# Altium PCB Pukk-Display-Module-v1.0.PcbDoc (part 5 of 5)
Units mil, origin at the board's own origin, x right, y up, seen from the top; angles counter-clockwise.
Board outline 3740.16 x 1574.8 mil, 4 copper layers (Top Layer, GND, POWER, Bottom Layer), stack 61.653 mil thick; 157 components, 115 nets, 640 pads, 314 vias.
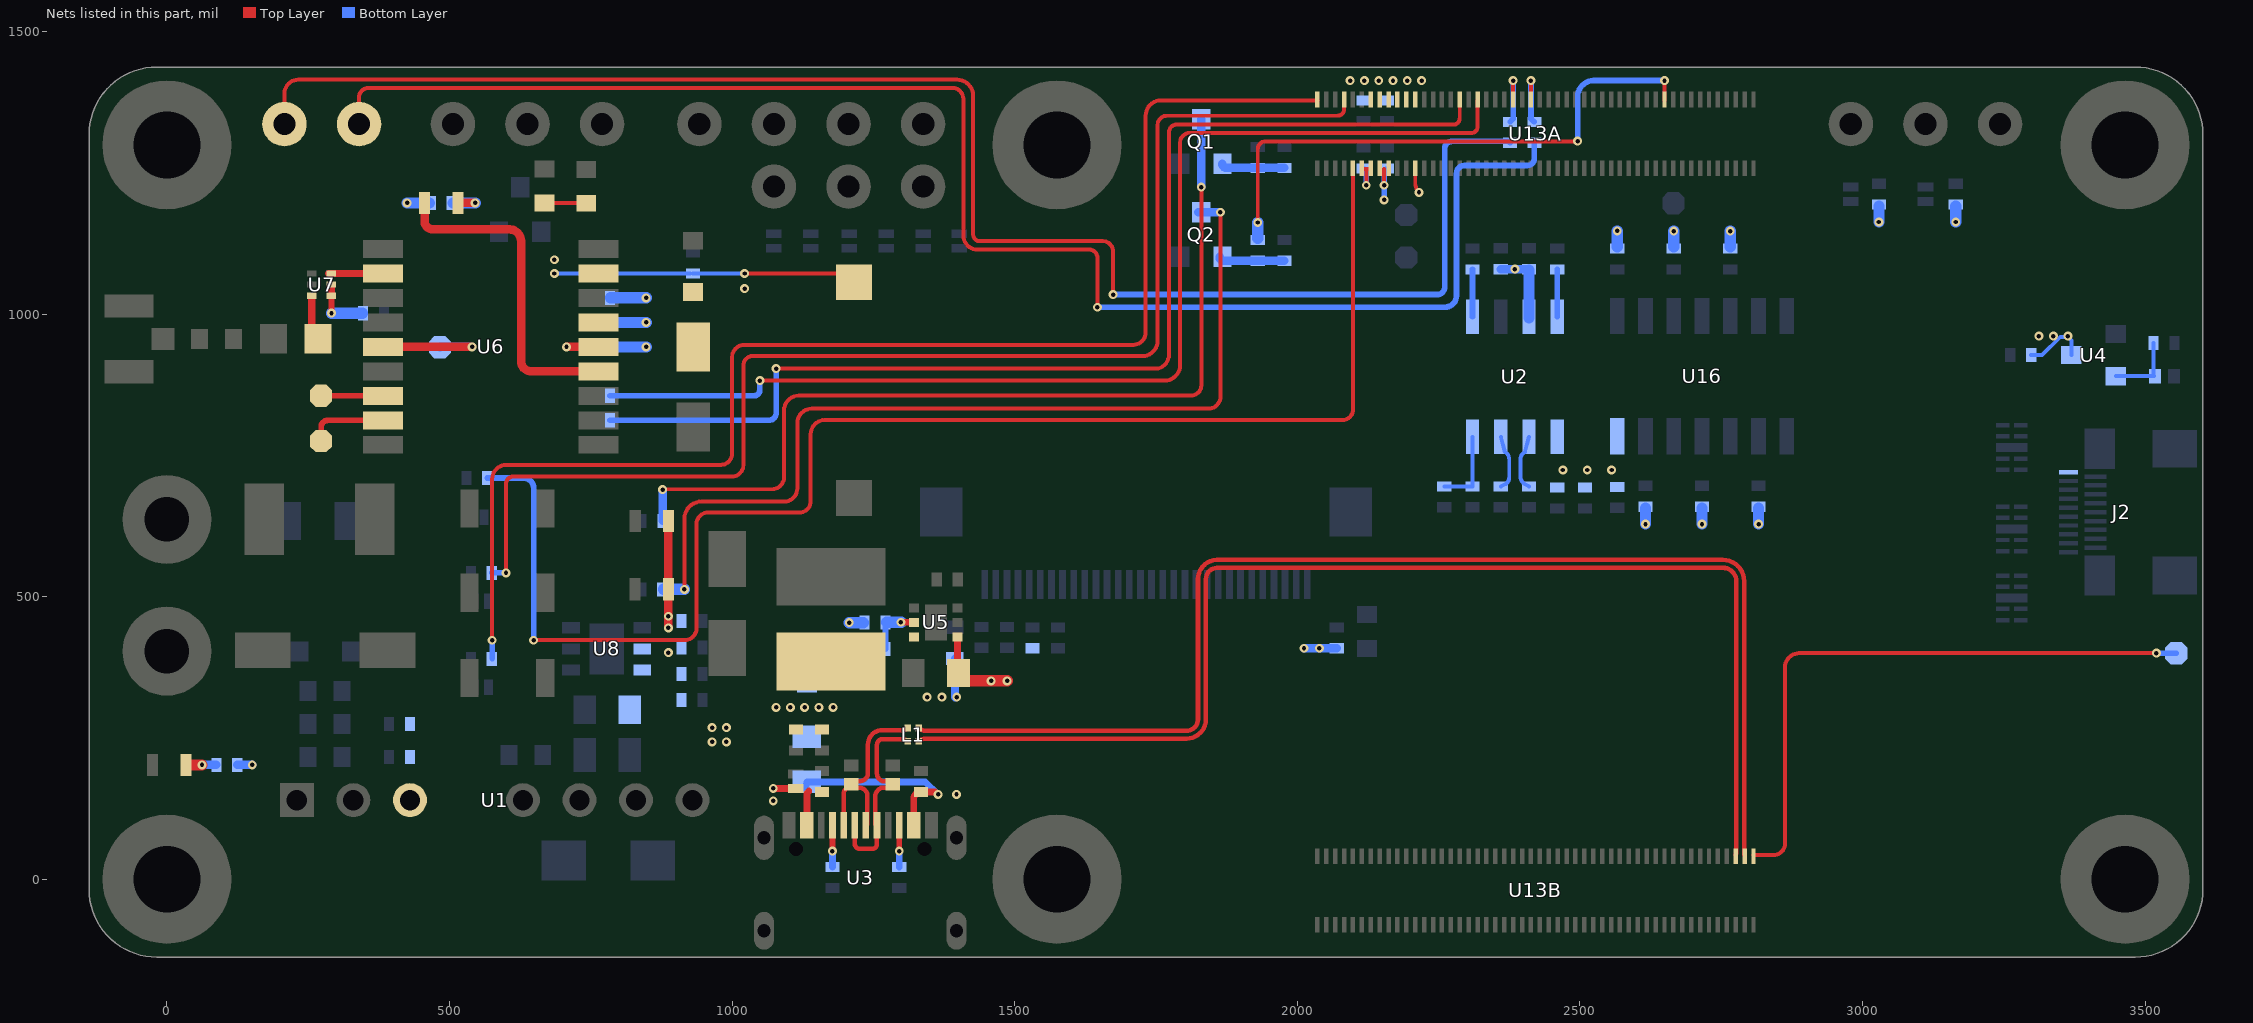
[diagram p5: the nets of this part, all layers, seen from the top]

## Via types
v1: diameter 15.75, hole 7.87, Top Layer to Bottom Layer, tented both sides, 314 vias

## Nets (pads, with @x,y where several pads share a name; then routed paths per layer and width w, separated by ;. In a path a pad name is that pad's centre, name@x,y a point inside that pad or via, vN(x,y) a via of type N, cw(c..) or ccw(c..) an arc to the next point about the centre after c; other vN are vias at no path point) (continued)
NetJ4_1: J4.1 R21.1 U6.6 | length 525.1
  Top Layer w7: v1(1022.01,1071.69) J4.1@1213.87,1071.69 ; J4.1@1213.87,1058.15 J4.1@1215.72,1056.3
  Bottom Layer w7: v1(685.5,1071.69) R21.1@925.16,1071.69 ; R21.1@931.01,1071.69 v1(1022.01,1071.69)
  other v1: 1022.01,1045 685.5,1096
NetL3_1: L3.1 U7.3 | length 80.9
  Top Layer w13.1: U7.3@256.54,1030.68 256.54,966.81 ccw(c267.37,966.81) L3.1@267.37,955.99
NetLED1_1: LED1.1 R1.2 | length 51
  Top Layer w20: LED1.1@35.76,202 v1@61.71,202
  Bottom Layer w15: v1(62.09,202.38) R1.2@87.12,202.38
NetLED2_1: LED2.1 R22.2 | length 72
  Top Layer w15: LED2.1@514.89,1196.46 v1(545.37,1196.51)
  Bottom Layer w7: R22.2@503.87,1196.46 R22.2@506.37,1196.46
  Bottom Layer w20: R22.2@506.37,1196.46 506.42,1196.51 v1(545.37,1196.51)
NetLED2_2: LED2.2 U6.4 | length 583.3
  Top Layer w15: LED2.2@455.84,1196.46 455.84,1164.29 ccw(c470.38,1164.29) 470.38,1149.75 606.15,1149.75 cw(c606.15,1129.3) 626.59,1129.3 626.59,916.43 ccw(c644.56,916.43) 644.56,898.47 U6.4@763.89,898.47
NetP6_1: P6.1 U6.17 | length 140.3
  Top Layer w10: P6.1@273.03,775.59 273.03,800.36 cw(c284.52,800.36) 284.52,811.85 U6.17@382,811.85
NetP7_1: P7.1 U6.16 | length 109.4
  Top Layer w10: P7.1@272.64,855.21 U6.16@382,855.16
NetP8_1: P8.1 U6.14 | length 215.4
  Top Layer w15: U6.14@382,941.77 v1(540,941.77)
  Bottom Layer w15: P8.1@483,941 cw(c483.77,941) 483.77,941.77 v1(540,941.77)
NetQ1_1: Q1.1 R33.2 R35.2 | length 113.6
  Bottom Layer w15: Q1.1@1867.5,1265.63 ccw(c1874.61,1265.63) 1874.61,1258.52 R33.2@1930,1258.52 R35.2@1977,1258.52
NetQ1_3: Q1.3 R30.2 | length 1634.8
  Top Layer w7: v1(877.06,689.36) 877.7,690 1070.66,690 ccw(c1070.66,711.11) 1091.77,711.11 1091.77,828.88 cw(c1118.66,828.88) 1118.66,855.77 1812.04,855.77 ccw(c1812.04,873.83) 1830.1,873.83 v1(1830.1,1224.56)
  Bottom Layer w7: R30.2@876.68,634 R30.2@876.87,634.19 ; v1@876.87,689.17 v1(877.06,689.36)
  Bottom Layer w15: R30.2@876.87,634.19 v1@876.87,689.17 ; v1(1830.1,1224.56) Q1.3@1830.1,1344.37
NetQ2_1: Q2.1 R34.2 R36.2 | length 118.7
  Bottom Layer w15: Q2.1@1862.4,1101.26 ccw(c1869.51,1101.26) 1869.51,1094.15 R34.2@1930,1094.15 R36.2@1977,1094.15
NetQ2_3: Q2.3 R31.2 | length 1648.2
  Top Layer w7: v1(915.64,512.86) 915.64,637.73 cw(c946.17,637.73) 946.17,668.26 1092.29,668.26 ccw(c1092.29,691.4) 1115.43,691.4 1115.43,806.78 cw(c1141.33,806.78) 1141.33,832.68 1842.88,832.68 ccw(c1842.88,853.8) 1864,853.8 v1(1864,1180)
  Bottom Layer w15: Q2.3@1825,1180 Q2.3@1830.1,1180 v1(1864,1180)
  Bottom Layer w20: R31.2@878.73,512.86 v1(915.64,512.86)
NetR3_1: R3.1 R4.2 U1.3
NetR5_2: R5.2 R6.2 U2.8 | length 137.7
  Bottom Layer w7: R5.2@2260,695 R6.2@2310,695 U2.8@2310,782.7
NetR7_1: R7.1 U2.7 | length 98.9
  Bottom Layer w7: R7.1@2360,695 2369,699.47 ccw(c2360,711.47) 2375,711.47 2375,734.74 2375,742.73 ccw(c2360,742.73) 2367.56,755.69 U2.7@2360,782.7
NetR8_2: R8.2 U2.1 | length 83.7
  Bottom Layer w10: U2.1@2310,995.3 R8.2@2310,1079
NetR9_1: R9.1 U2.6 | length 98.6
  Bottom Layer w7: R9.1@2410,695 2401,699.99 cw(c2410,711.99) 2395,711.99 2395,742.7 cw(c2410,742.7) 2402.5,755.69 U2.6@2410,782.7
NetR10_2: R10.2 U2.4 | length 83.7
  Bottom Layer w10: U2.4@2460,995.3 R10.2@2460,1079
NetR11_1: R11.1 SB1.2 | length 74.5
  Top Layer w7: SB1.2@668,1196.51 742,1196.51 R11.1@742,1196
NetR15_1: R15.1 R16.2 U5.5 | length 96
  Top Layer w12: v1(1298.69,454.6) U5.5@1321.82,454.6
  Bottom Layer w10: R16.2@1271.46,407.22 R15.1@1271.46,454.23 R15.1@1271.46,454.6
  Bottom Layer w20: R15.1@1273.46,454.6 v1(1298.69,454.6) v1@1299,454.6
NetR17_1: R17.1 R18.2 U5.1 | length 216.3
  Top Layer w12: U5.1@1398.97,428.64 1398.97,366.61 R18.2@1400.58,365 ccw(c1414.56,365) R18.2@1414.56,351.02
  Top Layer w20: R18.2@1414.56,351.02 v1(1458.38,351.02) v1(1486.59,351.02)
  Bottom Layer w15: v1(2011.81,408.59) v1(2039,408.59) R17.1@2069.82,408.59
NetR23_2: R23.2 U6.5 | length 96.9
  Top Layer w15: v1(707,941.74) U6.5@763.89,941.74
  Bottom Layer w10: v1(707,941.74) R23.2@747,941.74
PWRON_KEY: R32.1 U13A.99 | length 2398.6
  Top Layer w7: v1(575.42,422.88) 575.42,707.83 cw(c600.72,707.83) 600.72,733.12 980,733.12 ccw(c980,753.12) 1000,753.12 1000,923.56 cw(c1022.01,923.56) 1022.01,945.58 1710.12,945.58 ccw(c1710.12,967.17) 1731.71,967.17 1731.71,1350.92 cw(c1758.75,1350.92) 1758.75,1377.95 U13A.99@2035.43,1377.95
  Bottom Layer w7: R32.1@574.87,389.86 R32.1@575.42,390.41
  Bottom Layer w10: R32.1@575.42,390.41 v1(575.42,422.88)
RECOVERY_KEY: R29.2 U13A.93 | length 2299.1
  Top Layer w7: v1(600,542) 600,699.99 cw(c612.41,699.99) 612.41,712.4 999.28,712.4 ccw(c999.28,733.12) 1020,733.12 1020,909.19 cw(c1036.39,909.19) 1036.39,925.58 1725.96,925.58 ccw(c1725.96,952.47) 1752.86,952.47 1752.86,1334.5 cw(c1769.13,1334.5) 1769.13,1350.77 2071.38,1350.77 ccw(c2071.38,1362.07) 2082.67,1362.07 U13A.93@2082.67,1377.95
  Bottom Layer w10: R29.2@574.87,542 v1(600,542)
RESETn_KEY: R26.2 U13A.92 | length 2601.6
  Top Layer w7: v1@646.88,422.88 915.9,422.88 ccw(c915.9,444) 937.02,444 937.02,628.11 cw(c957.81,628.11) 957.81,648.9 1119.14,648.9 ccw(c1119.14,668.84) 1139.08,668.84 1139.08,787.56 cw(c1163.91,787.56) 1163.91,812.39 2080,812.39 ccw(c2080,830.81) 2098.42,830.81 U13A.92@2098.42,1256.69
  Bottom Layer w10: R26.2@566.87,709.86 631.05,709.86 cw(c631.05,692.02) 648.88,692.02 v1(648.88,422.88)
RF_OUT: U6.11 U7.6 | length 95.7
  Top Layer w13.1: U7.6@286.34,1071.69 U7.6@290.99,1071.69 U6.11@382,1071.69
TYPEC_CC1: R13.2 U3.A5 | length 74
  Top Layer w10: v1(1177.54,49.69) U3.A5@1177.56,95.73
  Bottom Layer w12: R13.2@1177.56,21.73 v1(1177.54,49.69)
TYPEC_CC2: R14.2 U3.B5 | length 74
  Top Layer w10: v1(1295.65,49.69) U3.B5@1295.67,95.73
  Bottom Layer w12: R14.2@1295.67,21.73 v1(1295.65,49.69)
UART2_RX_M0: R28.1 U13A.55 | length 110.5
  Top Layer w7: U13A.55@2381.89,1377.95 v1(2381.89,1413.09)
  Bottom Layer w10: R28.1@2376.46,1340 2381.89,1345.43 v1(2381.89,1413.09)
UART2_RXD: P20.1 R28.2 | length 2852.6
  Top Layer w7: P20.1@208,1336 208,1390 cw(c232.56,1390) 232.56,1414.56 1398.08,1414.56 cw(c1398.08,1386.12) 1426.53,1386.12 1426.53,1140.6 ccw(c1438.13,1140.6) 1438.13,1129 1655.47,1129 cw(c1655.47,1110.23) 1674.24,1110.23 1674.24,1034.42 v1(1674.06,1034.42)
  Bottom Layer w10: v1(1674.06,1034.42) 2247.68,1034.42 ccw(c2247.68,1047.51) 2260.78,1047.51 2260.78,1292.35 cw(c2273.92,1292.35) 2273.92,1305.5 2373.96,1305.5 R28.2@2376.46,1303
UART2_TX_M0: R27.1 U13A.51 | length 111.1
  Top Layer w7: U13A.51@2413.38,1377.95 v1(2413.38,1413.09)
  Bottom Layer w10: v1(2413.38,1413.09) 2413.38,1345.5 2418.88,1340 R27.1@2419.46,1340
UART2_TXD: P21.1 R27.2 | length 2769.3
  Top Layer w7: P21.1@340,1336 340,1383.28 cw(c356.56,1383.28) 356.56,1399.84 1390.18,1399.84 cw(c1390.18,1381.02) 1409,1381.02 1409,1139.39 ccw(c1434.4,1139.39) 1434.4,1114 1631.43,1114 cw(c1631.43,1099.06) 1646.37,1099.06 v1(1646.37,1012)
  Bottom Layer w10: v1(1646.37,1012) 2261.16,1012 ccw(c2261.16,1032.51) 2281.67,1032.51 2281.67,1248.41 cw(c2296.03,1248.41) 2296.03,1262.77 2406.85,1262.77 ccw(c2406.85,1275.38) 2419.46,1275.38 R27.2@2419.46,1303
UART6_RX_M1: R25.1 U13A.67 | length 2042.7
  Top Layer w7: v1(1078,903.41) 1751.96,903.41 ; 1752,903.41 ccw(c1751.96,910.41) 1753.61,903.61 ccw(c1747.49,928.37) 1773,928.37 1773,1321.61 cw(c1786.52,1321.61) 1786.52,1335.13 2276.1,1335.13 ccw(c2276.1,1346.42) 2287.4,1346.42 U13A.67@2287.4,1377.95
  Bottom Layer w10: R25.1@784,812 1065,812 ccw(c1065,825) 1078,825 v1(1078,903.41)
UART6_TX_M1: R24.1 U13A.63 | length 2029.4
  Top Layer w7: v1(1049,882.04) 1765.04,882.04 ccw(c1765.04,909.7) 1792.7,909.7 1792.7,1303.61 cw(c1809.22,1303.61) 1809.22,1320.13 2307.52,1320.13 ccw(c2307.52,1331.51) 2318.89,1331.51 U13A.63@2318.89,1377.95
  Bottom Layer w10: R24.1@784,855.31 1038.93,855.31 ccw(c1038.93,865.38) 1049,865.38 v1(1049,882.04)
USB_D_N: D7.1 L1.3 U3.A7 U3.B7 | length 344.6
  Top Layer w8: U3.B7@1197.24,95.73 1197.24,149.95 cw(c1211.08,149.95) D7.1@1211.08,163.79 ; D7.1@1211.02,167.94 1216.43,173.34 1225.73,173.34 ccw(c1225.73,187.91) 1240.3,187.91 1240.3,238.11 cw(c1266.01,238.11) 1266.01,263.83 1301.54,263.83 ccw(c1301.54,276.84) L1.3@1310.74,267.64 ; D7.1@1213.04,166.46 1219.52,161.72 1225.37,161.72 cw(c1225.37,147.64) 1239.46,147.64 1239.46,98.57 cw(c1236.61,98.57) U3.A7@1236.61,95.73 ccw(c1236.61,97.57) U3.A7@1238.46,97.57
USB_D_P: D6.1 L1.4 U3.A6 U3.B6 | length 360
  Top Layer w8: U3.A6@1216.93,95.73 1216.93,63.18 ccw(c1226.5,63.18) 1226.5,53.6 1247.65,53.6 ccw(c1247.65,62.25) 1256.3,62.25 U3.B6@1256.3,95.73 cw(c1256.3,98.57) 1253.46,98.57 1253.46,146.68 cw(c1268.97,146.68) 1268.97,162.19 1278.2,162.19 D6.1@1283.96,167.94 1278.96,172.94 1270.27,172.94 cw(c1270.27,186.9) 1256.3,186.9 1256.3,238.11 cw(c1266.01,238.11) 1266.01,247.83 1301.54,247.83 cw(c1301.54,234.82) L1.4@1310.74,244.02
USB_OTG0_D_N: L1.1 U13B.3 | length 2246.7
  Top Layer w8: L1.1@1330.43,267.64 ccw(c1342.04,279.25) 1342.04,262.83 1804.24,262.83 ccw(c1804.24,282.86) 1824.28,282.86 1824.28,531.09 cw(c1858.24,530.98) 1857.2,564.92 cw(c1857.83,542.93) 1857.77,564.93 2753.02,564.93 cw(c2753.02,527.49) 2790.46,527.49 2790.46,46.15 ccw(c2798.46,46.15) 2791.3,42.59 U13B.3@2791.34,42.51
USB_OTG0_D_P: L1.2 U13B.5 | length 2224.8
  Top Layer w8: L1.2@1330.43,244.02 cw(c1342.04,232.4) 1342.04,248.83 1804.24,248.83 ccw(c1804.24,282.86) 1838.28,282.86 1838.28,531.04 cw(c1858.24,530.98) 1857.61,550.93 cw(c1857.83,542.93) 1857.79,550.93 2753.02,550.93 cw(c2753.02,527.49) 2776.46,527.49 2776.46,46.15 cw(c2768.46,46.15) 2775.63,42.59 U13B.5@2775.59,42.51
USB_OTG0_ID: P19.1 U13B.1 | length 1085.7
  Top Layer w7: U13B.1@2807.08,42.51 2842.13,42.51 ccw(c2842.13,63.28) 2862.9,63.28 2862.9,374.92 cw(c2887.98,374.92) 2887.98,400 v1(3520,400)
  Bottom Layer w10: v1(3520,400) P19.1@3555,400
VCC1V8: C10.2 U13A.88 U13A.90 | length 73.2
  Top Layer w7: U13A.90@2114.17,1256.69 2122.04,1256.69 ; v1@2122.04,1229.79 2122.04,1256.69 ; U13A.88@2129.92,1256.69 2122.04,1256.69
  Bottom Layer w7: C10.2@2117.17,1257.56 cw(c2117.17,1252.69) C10.2@2122.04,1252.69
  Bottom Layer w10: v1@2122.04,1229.79 C10.2@2122.04,1252.69
  other v1: 2122.04,1227.79
VCC3V3: C9.2 C13.2 C14.2 C80.1 R37.2 R38.2 R39.2 R121.2 R122.2 R123.2 R124.2 R125.2 U2.5 U13A.78 U13A.84 U13A.86 U16.14 | length 352.1
  Top Layer w7: v1@2153.54,1229.79 2153.54,1256.69 ; U13A.78@2208.66,1256.69 2208.66,1231.3 ccw(c2231.36,1231.3) v1(2215.31,1215.26)
  Bottom Layer w7: C9.2@2153.54,1252.28 cw(c2158.83,1252.28) C9.2@2158.83,1257.56
  Bottom Layer w10: v1(2153.54,1202) v1(2153.54,1227.79) C9.2@2153.54,1252.28
  Bottom Layer w20: R121.2@2566,1118.81 v1@2566,1146.74 ; v1(2616,628.39) R37.2@2616,656.32 ; R122.2@2666,1118.81 v1(2666,1146.74) ; v1(2716,628.39) R125.2@2716,656.32 ; R123.2@2766,1118.81 v1(2766,1146.74) ; v1(2816,628.39) R124.2@2816,656.32 ; v1(3029,1162.79) R38.2@3029,1190.72 ; v1(3165,1162.79) R39.2@3165,1190.72
  other v1: 2470,724 2513,724 2556,724 2566,1147.09
VCC3V3_SYS: C27.2 C28.1 C29.2 C30.2 C34.2 C35.2 D13.2 FB1.1 LED3.1 LED4.1 R15.2 R19.2 R22.1 R23.1 U6.8 U7.4 U7.5 U8.2 | length 615
  Top Layer w10: v1@291.11,1001.53 U7.4@291.11,1032.32
  Top Layer w12: U7.4@291.01,1032.34 U7.5@291.01,1051.02
  Top Layer w15: v1(887.3,444.68) v1(887.3,465.19) LED3.1@887.3,512.86 LED4.1@887.3,634
  Bottom Layer w15: v1@1394.37,322.07 FB1.1@1394.37,390.47
  Bottom Layer w20: v1(291.18,1001.46) C27.2@346,1001.46 ; v1(425,1196.46) R22.1@464.36,1196.46 ; R23.1@785,941.74 v1(848,941.74) ; C29.2@785,985.14 v1(848,985.14) ; C30.2@785,1028.54 v1(848,1028.54) ; v1(1207.22,453.86) R15.2@1231.86,453.86
  other v1: 1344.96,322.07 1371.17,322.07 1397.37,322.07 887.3,401.08
VCC5V0_SYS: C7.2 C8.2 C11.2 C12.2 C15.2 C16.2 C19.2 C21.2 C32.2 C33.2 L2.1 R1.1 R2.2 R12.1 U2.3 U4.3 U5.6 U8.3 U13A.77 U13A.79 U13A.81 U13A.83 U13A.85 U13A.87 | length 275.3
  Bottom Layer w7: C19.2@3298.4,927.4 3317.9,927.4 3349.87,959.36 3361.8,959.36 v1(3363.48,961.04) 3363.48,958.87 3369.46,952.9 U4.3@3369.46,927.4
  Bottom Layer w15: R1.1@124.88,202.38 v1(151,202.38) ; C11.2@2360,1079.35 C12.2@2410,1079.35
  Bottom Layer w20: U2.3@2410,993.3 C12.2@2410,1077.35
  other v1: 964.75,242.98 990,242.98 964.75,268.23 990,268.23 1077.73,304 1102.98,304 1128.23,304 1153.49,304 1178.74,304 3311.98,961.04 3337.73,961.04 2385,1079.35 2093.53,1413.09 2118.78,1413.09 2144.04,1413.09 2169.29,1413.09 2194.54,1413.09 2219.79,1413.09
VCC5V_HDMI: C20.2 D11.1 J2.19 U4.2 | length 126.4
  Bottom Layer w7: U4.2@3448.2,890 3515.59,890 cw(c3515.59,890.76) 3514.83,890.76 C20.2@3514.83,948.54
VUSB_5V: C17.2 C18.2 D5.1 R12.2 U3.A4/B9 U3.B4/A9 | length 508.3
  Top Layer w12: v1(1072.71,160.65) 1072.71,160.31 D5.1@1112.96,160.31 ; U3.A4/B9@1132.28,95.73 1132.28,151.61 1135.45,154.77 1135.45,155.91 ; U3.B4/A9@1321.26,95.73 1321.26,141.61 cw(c1334.26,141.61) C18.2@1334.26,154.61 1334.6,154.27 1359.23,154.27 1363.55,149.95 v1(1364.57,149.95)
  Bottom Layer w12: v1(1072.71,160.65) 1120.7,160.65 ccw(c1120.7,172.23) R12.2@1132.28,172.23 1330.55,172.23 1330.63,172.23 1341.77,172.23 1364.05,149.95 v1(1364.57,149.95)
  other v1: 1072.71,138.51 1397.05,149.95
WORK_LED: R34.1 U13A.21 | length 1015.2
  Top Layer w7: v1(1930,1161.89) 1930,1291.37 cw(c1944.1,1291.37) 1944.1,1305.47 2495.47,1305.47 v1(2496,1306) ; U13A.21@2649.6,1377.95 v1(2649.6,1413.09)
  Bottom Layer w10: v1(2496,1306) 2496.06,1306.06 2496.06,1384.46 cw(c2524.68,1384.46) 2524.68,1413.09 v1(2649.6,1413.09)
  Bottom Layer w20: R34.1@1930,1133.96 v1(1930,1161.89)
pads on no net: J2.2 J3.4 J3.6 J3.8 J3.26 J3.28 J3.30 U1.5 U1.8 U3.A8 U3.B8 U3.MH U6.7 U6.9 U6.13 U6.15 U6.18 U8.1 U8.4 U8.5 U13A.3 U13A.4 U13A.5 U13A.6 U13A.9 U13A.10 U13A.11 U13A.12 U13A.15 U13A.16 U13A.17 U13A.18 U13A.19 U13A.25 U13A.27 U13A.28 U13A.30 U13A.34 U13A.35 U13A.36 U13A.37 U13A.38 U13A.39 U13A.40 U13A.41 U13A.45 U13A.47 U13A.49 U13A.54 U13A.64 U13A.68 U13A.69 U13A.70 U13A.72 U13A.73 U13A.75 U13A.76 U13A.89 U13A.91 U13A.94 U13A.96 U13A.97 U13A.100 U13B.2 U13B.4 U13B.6 U13B.9 U13B.10 U13B.11 U13B.12 U13B.15 U13B.16 U13B.17 U13B.18 U13B.21 U13B.22 U13B.23 U13B.24 U13B.27 U13B.28 U13B.29 U13B.30 U13B.33 U13B.34 U13B.35 U13B.36 U13B.39 U13B.40 U13B.41 U13B.42 U13B.43 U13B.45 U13B.46 U13B.47 U13B.48 U13B.49 U13B.52 U13B.54 U13B.57 U13B.58 U13B.59 U13B.60 U13B.63 U13B.64 U13B.65 U13B.66 U13B.69 U13B.71

## Polygon pours and split planes (outlines as drawn)
GND on GND "NONET_L-01_P-001" (solid, remove dead copper, pour order 25): -137.8,-17.8 -137.8,1317.01 cw(c-17.8,1317.01) -17.8,1437.01 3482.36,1437.01 cw(c3482.36,1317.01) 3602.36,1317.01 3602.36,-17.8 cw(c3482.36,-17.8) 3482.36,-137.8 -17.8,-137.8 cw(c-17.8,-17.8)
VCC3V3 on POWER "NONET_L-01_P-001" (solid, pour order 21): 3194.64,1259 cw(c3194.64,1238.11) 3215.53,1238.11 3215.53,1126.53 cw(c3193.66,1126.53) 3193.66,1104.66 2734.63,1104.66 2649.6,1104.66 ccw(c2649.6,1077.06) 2622,1077.06 2622,1055 2622,807.93 ccw(c2651.92,807.92) 2651.93,778 2817,778 cw(c2817,751) 2844,751 2844,623 cw(c2812,623) 2812,591 2404,591 cw(c2404,619) 2376,619 2376,750.13 cw(c2403.86,750.14) 2403.87,778 2465.5,778 2478,778 ccw(c2478,806) 2506,806 2506,1087.5 ccw(c2488.5,1087.5) 2488.5,1105 2165,1105 cw(c2165,1129.06) 2140.94,1129.06 2140.94,1236.94 cw(c2162.99,1236.95) 2163,1259
NetR17_1 on POWER "NONET_L-01_P-001" (solid, pour order 1): 2070,289.44 cw(c2043.56,289.44) 2043.56,263 1468.76,263 cw(c1468.76,293.76) 1438,293.76 1438,508.28 cw(c1468.72,508.28) 1468.72,539 2036,539 cw(c2036,505) 2070,505
VCC3V3_SYS on POWER "NONET_L-01_P-001" (solid, pour order 19): 1288,295.19 ccw(c1320.19,295.19) 1320.19,263 1386.22,263 ccw(c1386.22,294.78) 1418,294.78 1418,514 ccw(c1393,514) 1393,539 1021,539 cw(c1021,567) 993,567 993,1202 ccw(c953,1202) 953,1242 279,1242 ccw(c279,1210.37) 247.37,1210.37 247.37,1034.63 ccw(c281,1034.63) 281,1001 707,1001 cw(c707,957) 751,957 751,402 ccw(c777,402) 777,376 1262,376 cw(c1262,350) 1288,350
VCC5V0_SYS on POWER "NONET_L-01_P-001" (solid, pour order 23): -137.8,-17.8 -137.8,1317.01 cw(c-17.8,1317.01) -17.8,1437.01 3482.36,1437.01 cw(c3482.36,1317.01) 3602.36,1317.01 3602.36,-17.8 cw(c3482.36,-17.8) 3482.36,-137.8 -17.8,-137.8 cw(c-17.8,-17.8)
GND on Top Layer "NONET_L-01_P-001" (solid, remove dead copper, pour order 0): -137.8,-17.8 -137.8,1317.01 cw(c-17.8,1317.01) -17.8,1437.01 3482.36,1437.01 cw(c3482.36,1317.01) 3602.36,1317.01 3602.36,-17.8 cw(c3482.36,-17.8) 3482.36,-137.8 -17.8,-137.8 cw(c-17.8,-17.8)
NetD1_1 on Top Layer "NONET_L-01_P-001" (solid, pour order 16): 332.99,574.01 332.99,704.33 cw(c346.57,704.33) 346.57,717.91 443.09,717.91 cw(c443.09,701) 460,701 460,571.68 cw(c449.89,571.68) 449.89,561.58 345.42,561.58 cw(c345.42,574.01)
GND on Bottom Layer "NONET_L-01_P-001" (solid, remove dead copper, pour order 24): -137.8,-17.8 -137.8,1317.01 cw(c-17.8,1317.01) -17.8,1437.01 3482.36,1437.01 cw(c3482.36,1317.01) 3602.36,1317.01 3602.36,-17.8 cw(c3482.36,-17.8) 3482.36,-137.8 -17.8,-137.8 cw(c-17.8,-17.8)

## Other copper
Top Layer:
  rectangle net VCC3V3: 2145.11,1246.85 2162.24,1266.58
  rectangle net VCC1V8: 2113.62,1246.85 2130.74,1266.58
  rectangle net VUSB_5V: 1099.18,145.61 1171.72,166.22
  rectangle net NetC1_2: 0,373.5 218.98,436.5
  region net GND: 2803.15,1406.73 2803.15,1351.44 2824.91,1351.44 2824.91,1406.73
  region net GND: 2803.15,1285 2803.15,1244.48 2860.32,1244.48 2860.32,1302.33 2633.74,1302.33 2633.74,1285 2677,1285 2677.16,1285
  region net GND: 2518.87,1310.55 2518.87,1304.4 cw(c2504.79,1304.4) 2504.79,1290.32 2242.57,1290.32 ccw(c2242.56,1283.97) 2236.22,1283.97 2236.22,1242.91 2244.09,1242.91 2244.09,1275.25 cw(c2249.41,1275.25) 2249.41,1280.57 2590.33,1280.57 ccw(c2590.33,1286.95) 2596.72,1286.95 2596.72,1292.85 ccw(c2590.29,1292.85) 2590.28,1299.28 2530.15,1299.28 cw(c2530.15,1310.55)
  region net GND: 2048,155.51 cw(c2048,148.39) 2055.11,148.39 2055.11,28.73 2047.24,28.73 2047.24,63.42 ccw(c2039.37,63.42) 2039.37,71.29 2023.14,71.29 ccw(c2023.14,64.65) 2016.49,64.65 2016.49,126.26 cw(c2035.47,126.26) 2035.47,145.24 2037.72,145.24 ccw(c2037.72,155.51)
  region net GND: 2307.08,1422.71 ccw(c2303,1422.86) 2303.15,1426.94 2255.83,1426.94 ccw(c2255.83,1423.07) 2251.97,1423.07 2251.97,1364.17 2259.89,1364.17 2259.89,1398.03 cw(c2266.3,1398.03) 2266.3,1404.44 2291.93,1404.44 cw(c2291.93,1397.17) 2299.21,1397.17 2299.21,1364.17 2307.08,1364.17
  region net GND: 2518.87,1307.48 2518.87,1288.31 ccw(c2522.57,1288.31) 2522.57,1284.61 2575.62,1284.61 ccw(c2575.62,1299.28) 2590.28,1299.28 cw(c2590.28,1330.51) 2559.05,1330.51 2559.05,1391.73 2551.18,1391.73 2551.18,1364.17 cw(c2538.27,1364.17) 2538.27,1351.26 2409.24,1351.26 cw(c2409.24,1358.93) 2401.57,1358.94 2401.57,1391.73 2393.7,1391.73 2393.7,1350.14 ccw(c2400.65,1350.14) 2400.65,1343.19 2469.53,1343.19 cw(c2469.53,1330.41) 2482.31,1330.41 2482.31,1328.56 ccw(c2487.08,1328.56) 2487.08,1323.78 2502.57,1323.78 cw(c2502.57,1307.48)
  region net NetJ4_1: 1247.21,1087.8 1021.18,1087.8 ccw(c1021.18,1075.14) 1008.53,1075.14 1008.53,1038.3 ccw(c1022.01,1038.3) 1022.01,1024.81 1247.21,1024.81
  region net NetJ4_1: 650.82,981.21 ccw(c662.7,981.21) 662.7,969.33 799.32,969.33 799.32,1000.83 697.86,1000.83 cw(c697.86,1010.24) 688.44,1010.24 688.44,1047.18 cw(c695.15,1047.19) 695.15,1053.89 705.33,1053.89 ccw(c705.33,1059.9) 711.34,1059.9 711.34,1105.79 ccw(c702.93,1105.79) 702.93,1114.2 661.86,1114.2 ccw(c661.86,1103.15) 650.82,1103.15
  region net VUSB_5V: 1407.16,163.61 cw(c1407.16,156.01) 1414.76,156.01 1414.76,141.46 cw(c1409.57,141.46) 1409.57,136.27 1339.77,136.27 ccw(c1339.77,129.57) 1333.07,129.57 1333.07,95.73 1309.45,95.73 1309.45,151.3 cw(c1321.76,151.3) 1321.76,163.61
  region net VUSB_5V: 1120.47,95.73 1120.47,121.13 ccw(c1112.6,121.13) 1112.6,129 1062.75,129 cw(c1062.75,136.44) 1055.32,136.44 1055.32,161.74 cw(c1063.58,161.74) 1063.58,170 1172.53,170 cw(c1172.53,163.79) 1178.74,163.79 1178.74,138.74 cw(c1173,138.74) 1173,133 1153,133 ccw(c1153,124.1) 1144.09,124.09 1144.09,95.73
  region net VCC1V8: 2133.85,1272.04 2133.85,1224.85 cw(c2122,1224.85) 2122,1213 cw(c2122,1224.77) 2110.23,1224.77 2110.23,1272.04
  region net VCC3V3: 2165.35,1272.04 2165.35,1201.81 cw(c2153.54,1201.81) 2153.54,1190 cw(c2153.54,1201.81) 2141.73,1201.81 2141.73,1272.04
  region net VCC5V0_SYS: 1280.03,415.61 cw(c1284.61,415.61) 1284.61,420.19 1331.05,420.19 1331.05,403.88 cw(c1325.17,403.88) 1325.17,398 1280.03,398
  region net VCC5V0_SYS: 2236.22,1406.27 cw(c2231.73,1406.27) 2231.73,1401.78 2217.85,1401.78 ccw(c2217.85,1396.53) 2212.6,1396.53 2212.59,1361.42 cw(c2204.49,1361.42) 2204.49,1353.32 2134.2,1353.32 cw(c2134.2,1361.53) 2125.98,1361.54 2125.98,1396.91 ccw(c2121.71,1396.91) 2121.71,1401.19 2083.28,1401.19 cw(c2083.28,1405.73) 2078.74,1405.73 2078.74,1421.74 cw(c2084,1421.74) 2084,1427 2168.92,1427 2231.47,1427 cw(c2231.47,1422.26) 2236.22,1422.26
  region net LEDA: 999.45,458.32 1030.41,458.32 cw(c1030.41,447.38) 1041.36,447.38 1041.36,314.74 cw(c1030.62,314.74) 1030.61,304 960.73,304 958.84,304 955.34,305.45 952.66,308.13 951.21,311.63 951.21,313.52 951.21,450 951.21,451.65 952.48,454.71 954.82,457.06 957.88,458.32 959.54,458.32
  pour cut-out: 2312.68,71.29 2312.68,148.08 2322.83,148.08 2322.83,71.29
  pour cut-out: 1910.53,470.98 1910.53,488.79 1927.84,488.79 1927.84,470.98
  pour cut-out: 214.28,313.52 214.28,275.42 211.02,275.42 211.02,313.52
  pour cut-out: 1851.63,470.98 1851.63,488.79 1868.93,488.79 1868.93,470.98
  pour cut-out: 1783.36,229.54 1783.36,231.44 1864.72,231.44 1864.72,229.54
  pour cut-out: 1695.36,1092.42 1695.36,1110.23 1712.67,1110.23 1712.67,1092.42
  pour cut-out: 1695.36,1171.16 1695.36,1188.97 1712.67,1188.97 1712.67,1171.16
  pour cut-out: 2467.62,1404.24 2467.62,1422.06 2484.92,1422.06 2484.92,1404.24
  pour cut-out: 2152.46,399.68 2152.46,417.49 2169.77,417.49 2169.77,399.68
  region net NetD13_1: 955.24,1196.11 957.82,1193.53 959.22,1190.15 959.22,1188.32 959.22,1122.34 959.22,1120.66 957.93,1117.54 955.55,1115.16 952.43,1113.87 950.75,1113.87 903.69,1113.87 901.96,1113.87 898.77,1115.19 896.32,1117.64 895,1120.83 895,1122.56 895,1190.36 896.36,1193.64 898.87,1196.15 902.15,1197.51 903.92,1197.51 951.86,1197.51
  region net NetC1_1: 282.19,718.63 284.9,717.91 287.5,716.83 289.93,715.43 292.16,713.72 294.15,711.73 295.86,709.5 297.26,707.07 298.34,704.47 299.06,701.76 299.43,698.97 299.43,563.03 299.48,561.58 299.86,558.7 300.61,555.9 301.72,553.22 303.17,550.71 304.93,548.41 306.98,546.36 309.28,544.59 311.8,543.14 314.47,542.03 317.28,541.28 320.15,540.91 321.6,540.86 441.47,540.86 445.44,540.07 449.18,538.52 452.55,536.27 455.41,533.41 457.66,530.04 459.21,526.3 460,522.33 460,346.48 459.6,343.46 458.81,340.51 457.65,337.7 456.12,335.06 454.27,332.64 452.11,330.49 449.7,328.63 447.06,327.11 444.24,325.94 441.3,325.15 438.28,324.76 280,324.76 278.44,324.76 275.34,325.16 272.33,325.97 269.44,327.17 266.74,328.73 264.26,330.63 262.05,332.84 260.15,335.31 258.59,338.02 257.39,340.9 256.58,343.92 256.18,347.02 256.18,348.58 256.18,485.12 256.12,486.78 255.69,490.06 255.29,491.54 254.83,493.26 253.57,496.32 251.91,499.19 249.9,501.81 247.55,504.15 244.93,506.17 242.06,507.83 239,509.09 235.8,509.95 232.52,510.38 230.87,510.44 165.56,510.44 163.69,510.44 159.97,510.93 156.34,511.9 152.87,513.33 149.62,515.21 146.64,517.5 143.99,520.15 141.7,523.13 139.83,526.38 138.39,529.85 137.42,533.47 136.93,537.19 136.93,539.07 136.93,697.89 137.95,704.47 138.01,704.69 139.07,707.25 140.45,709.64 142.13,711.84 144.09,713.8 146.29,715.48 148.68,716.86 151.24,717.92 153.91,718.64 156.65,719 158.04,719 279.4,719
  region net VCC3V3_SYS: 728.46,1087.44 728.46,1055.95 811.05,1055.95 814.17,1055.64 819.91,1053.26 824.31,1048.86 826.69,1043.11 827,1040 827,909.14 827,906.98 828.65,902.99 831.7,899.94 835.69,898.28 837.85,898.28 969.34,898.28 971.46,898.28 975.38,899.91 978.38,902.9 980,906.82 980,908.94 980,977.97 980,1075.19 977.67,1080.81 973.37,1085.11 967.75,1087.44 964.7,1087.44
  region net NetC1_2: 209.32,478.36 215.58,472.09 218.98,463.9 218.98,339.96 216.09,332.98 210.75,327.64 203.77,324.76 -7.76,324.76 -22.97,327.78 -37.3,333.72 -50.19,342.33 -61.16,353.3 -69.78,366.2 -75.71,380.53 -78.74,395.74 -78.74,411.25 -75.71,426.46 -69.78,440.79 -61.16,453.69 -50.19,464.66 -37.3,473.27 -22.97,479.21 -15.4,480.72 -8.72,481.75 201.13,481.75
  region net VCC5V0_SYS: 1330.9,436.35 1330.9,412.73 1331.05,412.73 1331.05,404.05 1331.05,402.85 1330.13,400.62 1329.51,400 1290.58,400 1290.58,398 1280.03,398 1278.36,397.84 1275.27,396.55 1272.9,394.19 1271.62,391.1 1271.46,389.42 1271.46,333 1270.22,330.02 1267.95,327.75 1264.97,326.51 1263.36,326.51 1206.89,326.51 1205.18,326.37 1202.01,325.09 1199.56,322.71 1198.22,319.57 1198.03,317.86 1198.03,267.64 1198.03,265.29 1196.23,260.95 1192.91,257.62 1188.57,255.83 1186.22,255.83 1088.98,255.83 1086.94,255.63 1083.18,254.07 1080.3,251.19 1078.74,247.43 1078.54,245.39 1078.54,227.6 1078.54,225.86 1077.21,222.63 1074.74,220.16 1071.51,218.83 1069.77,218.83 960.73,218.83 958.84,218.83 955.34,220.28 952.66,222.95 951.21,226.45 951.21,279.4 952.72,283.05 955.52,285.84 959.16,287.35 1048.21,287.35 1050.71,287.6 1055.32,289.51 1058.85,293.04 1060.75,297.65 1061,300.14 1061,322.71 1061,423.15 1061,425.78 1063.01,430.63 1066.72,434.34 1071.58,436.35 1074.2,436.35 1314.36,436.36 hole: 1061,423.15 1061,423.15 1061,423.15
  region net NetD12_2: 1324.09,623.56 1328.61,619.04 1331.05,613.14 1331.05,495.73 1330.9,495.73 1330.9,472.1 1303.33,472.1 1303.26,472.06 1302.24,472.48 1295.13,472.48 1293.85,471.95 970.05,471.95 967.66,471.95 963.25,473.78 959.86,477.16 958.04,481.57 958.04,483.96 958.04,495.73 958.04,614.07 959.67,620.4 959.85,620.83 963.21,624.18 967.59,626 969.96,626 1315,626 1318.19,626
Bottom Layer:
  rectangle net NetC5_2: 650.01,202.5 747.68,237.5
  rectangle net NetC5_2: 719,-2.43 759,325
  rectangle net NetC1_2: 0,367.4 265,440
  rectangle net NetC1_1: 325,203.5 402,228.5
  rectangle net NetR3_1: 421,140 439,287
  rectangle net NetC1_1: 295,110 365.5,440
  rectangle net NetC1_2: 200,110 265,440
  rectangle net NetD1_2: 0,600.54 237.47,667.46
  region net GND: 626.49,569.5 628.49,567.5 628.49,514.78 619.49,505.78
  region net GND: 1472.44,548.85 1472.44,470.4 1446.85,470.4 1446.85,548.85
  region net GND: 1560.15,495.88 1560.15,495.23 cw(c1545.98,495.23) 1545.98,481.06 1545.98,469.59 1570.87,469.59 cw(c1570.87,470.93) 1569.52,470.93 1569.52,495.99
  region net GND: 598.87,564.87 601.35,564.87 cw(c601.35,543.53) 622.69,543.53 622.69,542.76 cw(c599.06,542.76) 599.06,519.13 ccw(c612.42,519.13) 612.42,505.78 619.49,505.78 ccw(c619.49,512.78) 626.49,512.78 626.49,569.5 603.49,569.5 ccw(c603.49,564.87)
  region net GND: 2889.01,723.4 ccw(c2894.19,723.4) 2894.19,718.22 ccw(c2894.19,721.37) 2897.34,721.37 2897.34,841.97 ccw(c2895.04,841.97) 2895.04,844.26 ccw(c2895.04,838.23) 2889.01,838.23
  region net GND: 2437.5,633 2437.5,659.23 cw(c2445.09,659.23) 2445.09,666.82 2582.18,666.82 cw(c2582.18,658.49) 2590.51,658.49 2590.51,634.13
  region net GND: 3392.71,598.27 3435.03,598.27 cw(c3435.03,593.9) 3439.4,593.9 3439.4,507.64 ccw(c3451.88,507.64) 3451.88,495.16 ccw(c3451.88,501.53) 3458.26,501.53 3458.26,599.78 ccw(c3451.88,599.78) 3451.88,606.15 3392.71,606.15
  region net NetD13_1: 905.96,1099.69 cw(c905.96,1110.65) 895,1110.65 895,1186.14 cw(c906.42,1186.14) 906.42,1197.56 948.47,1197.56 cw(c948.47,1186.03) 960,1186.03 960,1110.5 cw(c949.19,1110.5) 949.19,1099.69
  region net NetJ4_1: 662.4,1106.36 662.4,1067.88 ccw(c676.29,1067.88) 676.29,1054 981,1054 cw(c981,1045) 990,1045 990,1021 ccw(c1000,1021) 1000,1011 1036,1011 ccw(c1036,1019) 1044,1019 1044,1073.7 ccw(c1032.91,1073.7) 1032.91,1084.79 820.21,1084.79 cw(c820.21,1093) 812,1093 812,1108 ccw(c802.31,1108) 802.31,1117.69 673.74,1117.69 ccw(c673.74,1106.36)
  region net VUSB_5V: 1399.77,192.23 cw(c1399.77,177.7) 1414.3,177.7 1414.3,138.66 cw(c1403.78,138.66) 1403.78,128.13 1055.83,128.13 cw(c1055.83,140) 1043.97,140 1043.97,179.7 cw(c1056.5,179.7) 1056.5,192.23
  region net NetD1_1: 296.53,581.3 ccw(c320.03,581.3) 320.04,557.8 444.07,557.8 450.47,558.97 454.23,560.52 459.27,565.57 462,572.16 462,575.72 462,700.64 459.22,707.35 454.08,712.49 447.36,715.28 321.28,715.28 ccw(c321.27,690.53) 296.53,690.53
  region net NetC1_2: 0,324.76 157.24,324.76 cw(c157.24,299) 183,299 183,127 ccw(c200,127) 200,110 265,110 265,460 ccw(c242.76,460) 242.76,482.24 0,482.24 ccw(c0,403.5) -78.74,403.5 ccw(c0,403.5)
  region net NetD1_2: 243.94,715.28 cw(c243.94,692.21) 267,692.21 267,582.03 cw(c242.76,582.03) 242.76,557.8 211.8,557.8 0,557.8 cw(c0,636.54) -78.74,636.54 cw(c0,636.54) 0,715.28
  region net VCC3V3_SYS: 1341.34,402.28 ccw(c1341.34,391.57) 1330.63,391.57 1330.63,293.63 1332.84,288.29 1336.92,284.21 1342.26,282 1532.78,282 1537.93,284.13 1541.86,288.07 1544,293.21 1544,417.59 1519,417.59 1519,340 1518.75,337.46 1516.81,332.78 1513.22,329.19 1508.54,327.25 1506,327 1428.44,327 cw(c1428.49,337.49) 1418,337.54 1418,394.03 ccw(c1409.75,394.03) 1409.75,402.28
  region net VCC5V0_SYS: 1025,329.31 1025,354.79 cw(c1040.3,354.79) 1040.3,370.09 1114.83,370.09 1180.91,370.09 cw(c1180.91,355.09) 1195.91,355.09 1195.91,239.09 cw(c1180.06,238.85) 1180.29,223 864.37,223 862.77,223.32 861.27,223.94 859.92,224.84 858.77,225.99 857.87,227.34 857.25,228.84 856.93,230.44 856.93,231.25 856.93,257.31 ccw(c851.13,257.31) 851.13,263.11 793.64,263.11 cw(c793.63,268.74) 788,268.75 788,333.69 788.27,335.05 788.8,336.33 789.57,337.48 790.55,338.46 791.7,339.22 792.97,339.75 794.33,340.02 814.91,340.02 815.48,340.05 816.59,340.27 817.64,340.71 818.58,341.34 819.39,342.14 820.02,343.09 820.45,344.14 820.68,345.25 820.7,345.82 820.7,375.2 820.7,376.14 821.42,377.88 822.75,379.21 824.49,379.93 825.43,379.93 864.19,379.93 913.84,379.93 cw(c913.84,374.27) 919.5,374.27 919.5,296.55 ccw(c929.02,296.52) 929,287 1014.72,287 1015.73,287.05 1017.71,287.44 1019.57,288.21 1021.24,289.33 1022.67,290.76 1023.79,292.43 1024.56,294.29 1024.95,296.27 1025,297.27
  region net VCC5V_HDMI: 3338.9,725.3 3380.9,725.3 3380.9,716.38 3347.83,716.38 cw(c3347.82,725.3)
  region net VCC5V0_SYS: 2231,1427 cw(c2231,1420) 2238,1420 2238,1376 cw(c2231,1376) 2231,1369 2081,1369 2079.61,1369 2077.03,1370.07 2075.07,1372.03 2074,1374.61 2074,1421.39 2075.07,1423.97 2077.03,1425.93 2079.61,1427
  pour cut-out: 3184.76,489.04 3184.76,506.85 3167.46,506.85 3167.46,489.04
  pour cut-out: 2212.42,-2.58 2212.42,15.23 2195.11,15.23 2195.11,-2.58
  pour cut-out: 2238.16,-2.58 2238.16,15.23 2220.86,15.23 2220.86,-2.58
  pour cut-out: 2274.76,107.16 2274.76,124.97 2257.45,124.97 2257.45,107.16
  pour cut-out: 2343.4,-34.14 2343.4,-16.32 2326.09,-16.32 2326.09,-34.14
  pour cut-out: 2316.59,-34.14 2316.59,-16.32 2299.28,-16.32 2299.28,-34.14
  region net NetC1_1: 451.95,479.19 457.59,473.55 460.64,466.19 460.64,462.21 460.64,347.6 460.64,343.3 457.34,335.35 451.26,329.26 443.3,325.97 389.96,325.97 385.19,325.5 376.37,321.85 369.63,315.1 365.97,306.28 365.5,301.51 365.5,247 365.86,243.39 368.62,236.72 373.72,231.62 380.39,228.86 384,228.5 402,228.5 402,203.5 395.5,203.5 392.87,203.24 388,201.22 384.28,197.5 382.26,192.63 382,190 382,126.5 382,123.22 379.49,117.15 374.85,112.51 368.78,110 295,110 295,462.63 295,466.53 297.98,473.74 303.5,479.25 310.7,482.24 444.59,482.24
  region net VCC5V0_SYS: 3378.47,980.94 3380.28,980.94 3383.62,979.56 3386.18,977 3387.57,973.65 3387.57,971.85 3387.57,899.19 3387.57,897.36 3386.17,893.98 3383.58,891.39 3380.2,890 3378.37,890 3299.46,890 3297.46,890 3293.76,891.53 3290.93,894.36 3289.4,898.05 3289.4,900.05 3289.4,974.58 3290.61,977.5 3292.84,979.73 3295.76,980.94 3297.34,980.94
  region net VCC5V_HDMI: 3519.69,980.94 3520.53,980.94 3522.19,980.61 3523.76,979.96 3525.16,979.02 3526.36,977.82 3527.3,976.42 3527.95,974.85 3528.28,973.19 3528.28,972.35 3528.28,922.81 3528.28,912.99 3528.23,912.99 3528.23,867 3528.28,867 3528.28,847.28 3528.28,846.27 3527.89,844.28 3527.11,842.41 3525.99,840.73 3524.55,839.29 3522.87,838.17 3521,837.39 3519.01,837 3518,837 3391.57,837 3390.52,836.95 3388.47,836.54 3386.54,835.74 3384.8,834.58 3383.32,833.1 3382.16,831.36 3381.36,829.43 3380.95,827.37 3380.9,826.33 3380.9,718.51 3342.01,718.51 3340.9,719.62 3339.92,721.08 3339.25,722.7 3338.9,724.43 3338.9,864.56 3338.9,865.79 3339.38,868.19 3340.32,870.45 3341.68,872.49 3343.41,874.23 3345.45,875.59 3347.72,876.53 3350.12,877 3351.35,877 3401.91,877 3402.55,877.03 3403.82,877.29 3405.01,877.78 3406.08,878.5 3406.99,879.41 3407.71,880.48 3408.2,881.67 3408.45,882.94 3408.49,883.58 3408.49,899.19 3408.5,899.88 3408.79,901.24 3409.34,902.52 3410.12,903.66 3411.12,904.63 3412.28,905.38 3413.57,905.89 3414.94,906.15 3415.63,906.14 3479.14,906.14 3480.3,906.19 3482.58,906.65 3484.73,907.54 3486.66,908.83 3488.31,910.47 3489.6,912.41 3490.49,914.56 3490.94,916.84 3491,918 3491,971.7 3491,972.61 3491.35,974.39 3492.05,976.08 3493.06,977.59 3494.35,978.88 3495.86,979.89 3497.55,980.58 3499.33,980.94 3500.24,980.94
  region net VCC3V3: 2579.19,689.34 2579.19,688.25 2578.77,686.12 2577.93,684.11 2576.73,682.3 2575.19,680.77 2573.38,679.56 2571.37,678.73 2569.24,678.3 2568.16,678.3 2457.21,678.3 2456.25,678.3 2454.38,678.68 2452.61,679.41 2451.02,680.47 2449.67,681.82 2448.6,683.41 2447.87,685.18 2447.5,687.06 2447.5,688.01 2447.5,814.8 2579.19,814.8
  region net VCC3V3_SYS: 917.82,474.71 919.69,472.84 920.69,470.41 920.69,469.09 920.69,395.99 920.69,394.79 919.77,392.56 918.07,390.85 915.84,389.93 914.63,389.93 864.24,389.93 824.59,389.93 823.67,389.93 821.97,390.63 820.67,391.94 819.96,393.64 819.96,394.56 819.96,418.71 819.96,419.54 820.6,421.07 821.77,422.25 823.31,422.88 824.14,422.88 862.26,422.88 863.57,423.01 866.01,424.02 867.87,425.88 868.88,428.32 869.01,429.63 869.01,470.44 869.01,471.49 869.81,473.43 871.29,474.92 873.23,475.72 874.28,475.72 888.55,475.72 915.38,475.72
  region net NetC5_2: 760.45,340.05 766.77,337.97 767.17,337.7 768.64,336.23 769.8,334.5 770.59,332.58 771,330.54 771,329.5 771,-10.98 770.62,-12.92 769.86,-14.74 768.77,-16.37 767.37,-17.77 765.74,-18.86 763.92,-19.62 761.98,-20 631.76,-20 630.6,-20 628.33,-19.55 626.19,-18.66 624.27,-17.38 622.63,-15.74 621.35,-13.82 620.46,-11.68 620.01,-9.41 620.01,-8.25 620.01,65.86 621.75,72.14 622.72,73.6 624.41,75.29 626.4,76.62 628.61,77.53 630.96,78 632.15,78 678.03,78 679.28,78.07 681.72,78.57 684.02,79.54 684.31,79.74 686.08,80.94 687.83,82.71 689.2,84.79 690.14,87.1 690.61,89.55 690.67,90.8 690.67,177.95 690.61,179.13 690.15,181.45 689.24,183.63 688.84,184.23 687.93,185.6 686.26,187.27 684.3,188.58 682.12,189.48 679.8,189.94 678.62,190 660,190 659.02,190 657.09,190.38 655.27,191.14 653.63,192.23 652.24,193.62 651.15,195.26 650.39,197.08 650.01,199.01 650.01,199.99 650.01,328.38 651.82,334.63 652.62,335.82 654.24,337.45 656.15,338.72 658.28,339.6 660.53,340.05 661.68,340.05 753.96,340.05
Multi-Layer:
  pour cut-out: 1438.93,1300 ccw(c1576.77,1300) 1576.77,1162.15 ccw(c1576.77,1300) 1714.62,1300 ccw(c1576.77,1300) 1576.77,1437.84 ccw(c1576.77,1300)
  pour cut-out: 1438.93,0.78 ccw(c1576.77,0.78) 1576.77,-137.06 ccw(c1576.77,0.78) 1714.62,0.78 ccw(c1576.77,0.78) 1576.77,138.63 ccw(c1576.77,0.78)
  pour cut-out: -137.84,0 ccw(c0,0) 0,-137.84 ccw(c0,0) 137.84,0 ccw(c0,0) 0,137.84 ccw(c0,0)
  pour cut-out: -137.84,1299.21 ccw(c0,1299.21) 0,1161.37 ccw(c0,1299.21) 137.85,1299.21 ccw(c0,1299.21) 0,1437.05 ccw(c0,1299.21)
  pour cut-out: 3326.72,1299.21 ccw(c3464.57,1299.21) 3464.57,1161.36 ccw(c3464.57,1299.21) 3602.41,1299.21 ccw(c3464.57,1299.21) 3464.57,1437.05 ccw(c3464.57,1299.21)
  pour cut-out: 3326.72,0 ccw(c3464.57,0) 3464.57,-137.85 ccw(c3464.57,0) 3602.41,0 ccw(c3464.57,0) 3464.57,137.84 ccw(c3464.57,0)

## Silkscreen, mask and mechanical layers (free items; w line width, h text height)
Top Overlay:
  lines w1: 1072.82,1225.4 1074,1225.4
  lines w5: 170,1299.21 170,1254 188.81,1254 ; 359.19,1254 378,1254 378,1299.21
  lines w7.5: 1077.73,170 1077.73,294.64 1364.57,294.64 1364.57,162.11 ; 1570.35,163 1842,163 1842,365 1570.35,365 1570.35,163
  text "RIGHT" at 1276.92,1396.27 h50
  text "RXD" at 154.13,1390.85 h50
  text "TXD" at 286.13,1390.85 h50
  text "GND" at 447.13,1390.85 h50
  text "CAN-N" at 567.22,1391.19 h50
  text "CAN-P" at 710.66,1390.85 h50
  text "GND" at 888.13,1390.85 h50
  text "SEL" at 1020.13,1390.85 h50
  text "LEFT" at 1152.23,1391.6 h50
  text "ENA" at 2925.5,1390.85 h50
  text "ENB" at 3057.5,1390.85 h50
  text "COM" at 3189.6,1391.19 h50
  text "DEBUG" at 201.4,1235.93 h50
  text "1PPS" at 419.87,1233.36 h50
  text "TRM" at 632.69,1176.51 h50 r90
  text "1-100" at 2727.71,1160.48 h32
  text "DOWN" at 1279.7,1139.81 h50
  text "MID" at 1022.15,1134.48 h50
  text "UP" at 1154.14,1134.44 h50
  text "ANT" at -125.57,1053.54 h50
  text "RXD" at 120.32,838.2 h50
  text "TXD" at 120.32,758.2 h50
  text "RUN" at 789.18,672.85 h50
  text "RST" at 740.01,605 h50 r90
  text "POS" at -90.93,582.66 h50 r90
  text "FUSE" at 461.07,575 h50 r90
  text "STAT" at 788.77,551.71 h50
  text "BOOT" at 740.01,447.76 h50 r90
  text "NEG" at -90.93,349.62 h50 r90
  text "1" at 1859.79,331.49 h60
  text "PWR" at 740.01,305 h50 r90
  text "1" at 1380.94,260.79 h60
  text "5V" at -64.76,241.92 h50
  text "101-200" at 2661.82,109.11 h32
Bottom Overlay:
  text "EEP-nWP" at 2626,1177.12 h50
  text "SCL" at 2153.67,1156.93 h50
  text "SDA" at 2153.67,1081.93 h50
  text "VCC-RF" at 443.31,921.75 h50
  text "MIPI LCD DISPLAY" at 1926.5,759.56 h50
  text "OTG-ID" at 3515.48,381.93 h50
Dimension:
  drawing of 295 lines, arcs and shapes, not listed
  text "Layer" at 4724.34,1302 h60
  text "Name" at 5134.26,1302 h60
  text "Material" at 6064,1302 h60
  text "Thickness" at 6923.77,1302 h60
  text "Constant" at 7573.6,1302 h60
  text "Board Layer Stack" at 8143.46,1302 h60
  text "Top Overlay" at 5134.26,1182 h60
  text "Top Solder" at 5134.26,1062 h60
  text "Solder Resist" at 6064,1062 h60
  text "0.010mm" at 6923.77,1062 h60
  text "4" at 7573.6,1062 h60
  text "1" at 4724.34,942 h60
  text "Top Layer" at 5134.26,942 h60
  text "0.035mm" at 6923.77,942 h60
  text "Dielectric 2" at 5134.26,822 h60
  text "PP-006" at 6064,822 h60
  text "0.203mm" at 6923.77,822 h60
  text "4.74" at 7573.6,822 h60
  text "2" at 4724.34,702 h60
  text "GND" at 5134.26,702 h60
  text "CF-004" at 6064,702 h60
  text "0.030mm" at 6923.77,702 h60
  text "Dielectric 1" at 5134.26,582 h60
  text "FR-4" at 6064,582 h60
  text "1.030mm" at 6923.77,582 h60
  text "4.6" at 7573.6,582 h60
  text "3" at 4724.34,462 h60
  text "POWER" at 5134.26,462 h60
  text "CF-004" at 6064,462 h60
  text "0.030mm" at 6923.77,462 h60
  text "Dielectric 3" at 5134.26,342 h60
  text "PP-006" at 6064,342 h60
  text "0.203mm" at 6923.77,342 h60
  text "4.74" at 7573.6,342 h60
  text "4" at 4724.34,222 h60
  text "Bottom Layer" at 5134.26,222 h60
  text "0.035mm" at 6923.77,222 h60
  text "Bottom Solder" at 5134.26,102 h60
  text "Solder Resist" at 6064,102 h60
  text "0.010mm" at 6923.77,102 h60
  text "4" at 7573.6,102 h60
  text "Bottom Overlay" at 5134.26,-18 h60
  text "Total board thickness:" at 4724.34,-138 h60
  text "1.586mm" at 6923.77,-138 h60
Board Outline:
  the board outline again, w5
Drill Drawing:
  circle w10: c-94.38,3711.28 r20
  circle w10: c-94.38,3711.28 r33.33
  circle w10: c-94.38,2961.28 r33.33
  lines w10: -127.71,2811.28 -94.38,2777.94 -61.04,2811.28 -94.38,2844.61 -127.71,2811.28 ; -127.71,3077.94 -61.04,3077.94 -61.04,3144.61 -127.71,3144.61 -127.71,3077.94 ; -127.71,3227.94 -94.38,3244.61 -61.04,3227.94 -77.71,3261.28 -61.04,3294.61 -94.38,3277.94 -127.71,3294.61 -111.04,3261.28 -127.71,3227.94 ; -127.71,3394.61 -111.04,3394.61 -94.38,3377.94 -77.71,3394.61 -61.04,3394.61 -77.71,3411.28 -61.04,3427.94 -77.71,3427.94 -94.38,3444.61 -111.04,3427.94 -127.71,3427.94 -111.04,3411.28 -127.71,3394.61 ; -127.71,3594.61 -61.04,3594.61 -94.38,3527.94 -127.71,3594.61 ; -127.71,3894.61 -61.04,3894.61 -94.38,3827.94 -127.71,3894.61 ; -114.38,3091.28 -74.38,3091.28 -74.38,3131.28 -114.38,3131.28 -114.38,3091.28 ; -114.38,3401.28 -104.38,3401.28 -94.38,3391.28 -84.38,3401.28 -74.38,3401.28 -84.38,3411.28 -74.38,3421.28 -84.38,3421.28 -94.38,3431.28 -104.38,3421.28 -114.38,3421.28 -104.38,3411.28 -114.38,3401.28 ; -114.38,3581.28 -74.38,3581.28 -94.38,3541.28 -114.38,3581.28
  lines w15: -187.5,2732.94 7292.45,2732.94 ; -187.5,3932.94 7292.45,3932.94 ; 363.38,2582.94 363.38,4082.94 ; 963.22,2582.94 963.22,4082.94 ; 2082.89,2582.94 2082.89,4082.94 ; 2588.77,2582.94 2588.77,4082.94 ; 3322.57,2582.94 3322.57,4082.94 ; 4822.12,2582.94 4822.12,4082.94 ; 5411.97,2582.94 5411.97,4082.94 ; 6157.77,2582.94 6157.77,4082.94 ; -187.5,2582.94 7292.45,2582.94 7292.45,4082.94 -187.5,4082.94 -187.5,2582.94
  text "Symbol" at -97.5,3977.94 h72
  text "Count" at 408.38,3977.94 h72
  text "Hole Size" at 1008.22,3977.94 h72
  text "Plated" at 2127.89,3977.94 h72
  text "Hole Type" at 2633.77,3977.94 h72
  text "Drill Layer Pair" at 3367.57,3977.94 h72
  text "Via/Pad" at 4867.12,3977.94 h72
  text "Pad Shape" at 5456.97,3977.94 h72
  text "Template" at 6202.77,3977.94 h72
  text "314" at 408.38,3827.94 h60
  text "0.200mm (7.87mil)" at 1008.22,3827.94 h60
  text "PTH" at 2127.89,3827.94 h60
  text "Round" at 2633.77,3827.94 h60
  text "Top Layer - Bottom Layer" at 3367.57,3827.94 h60
  text "Via" at 4867.12,3827.94 h60
  text "Rounded" at 5456.97,3827.94 h60
  text "v40h20m0mx0" at 6202.77,3827.94 h60
  text "2" at 408.38,3677.94 h60
  text "0.600mm (23.62mil)" at 1008.22,3677.94 h60
  text "PTH" at 2127.89,3677.94 h60
  text "Slot" at 2633.77,3677.94 h60
  text "Top Layer - Bottom Layer" at 3367.57,3677.94 h60
  text "Pad" at 4867.12,3677.94 h60
  text "Rounded" at 5456.97,3677.94 h60
  text "r90_170h60_140r45" at 6202.77,3677.94 h60
  text "2" at 408.38,3527.94 h60
  text "0.600mm (23.62mil)" at 1008.22,3527.94 h60
  text "PTH" at 2127.89,3527.94 h60
  text "Slot" at 2633.77,3527.94 h60
  text "Top Layer - Bottom Layer" at 3367.57,3527.94 h60
  text "Pad" at 4867.12,3527.94 h60
  text "Rounded" at 5456.97,3527.94 h60
  text "(Mixed)" at 6202.77,3527.94 h60
  text "2" at 408.38,3377.94 h60
  text "0.620mm (24.41mil)" at 1008.22,3377.94 h60
  text "NPTH" at 2127.89,3377.94 h60
  text "Round" at 2633.77,3377.94 h60
  text "Top Layer - Bottom Layer" at 3367.57,3377.94 h60
  text "Pad" at 4867.12,3377.94 h60
  text "Rounded" at 5456.97,3377.94 h60
  text "c0hn62" at 6202.77,3377.94 h60
  text "7" at 408.38,3227.94 h60
  text "0.914mm (36.00mil)" at 1008.22,3227.94 h60
  text "PTH" at 2127.89,3227.94 h60
  text "Round" at 2633.77,3227.94 h60
  text "Top Layer - Bottom Layer" at 3367.57,3227.94 h60
  text "Pad" at 4867.12,3227.94 h60
  text "(Mixed)" at 5456.97,3227.94 h60
  text "(Mixed)" at 6202.77,3227.94 h60
  text "15" at 408.38,3077.94 h60
  text "1.000mm (39.37mil)" at 1008.22,3077.94 h60
  text "PTH" at 2127.89,3077.94 h60
  text "Round" at 2633.77,3077.94 h60
  text "Top Layer - Bottom Layer" at 3367.57,3077.94 h60
  text "Pad" at 4867.12,3077.94 h60
  text "Rounded" at 5456.97,3077.94 h60
  text "c200h100" at 6202.77,3077.94 h60
  text "2" at 408.38,2927.94 h60
  text "2.000mm (78.74mil)" at 1008.22,2927.94 h60
  text "PTH" at 2127.89,2927.94 h60
  text "Round" at 2633.77,2927.94 h60
  text "Top Layer - Bottom Layer" at 3367.57,2927.94 h60
  text "Pad" at 4867.12,2927.94 h60
  text "Rounded" at 5456.97,2927.94 h60
  text "c400h200" at 6202.77,2927.94 h60
  text "6" at 408.38,2777.94 h60
  text "3.000mm (118.11mil)" at 1008.22,2777.94 h60
  text "PTH" at 2127.89,2777.94 h60
  text "Round" at 2633.77,2777.94 h60
  text "Top Layer - Bottom Layer" at 3367.57,2777.94 h60
  text "Pad" at 4867.12,2777.94 h60
  text "Rounded" at 5456.97,2777.94 h60
  text "(Mixed)" at 6202.77,2777.94 h60
  text "350 Total" at 408.38,2627.94 h60
  text "Slot definitions :" at -97.5,2482.97 h60
  text "Routed Path Length" at 935.19,2482.97 h60
  text "= Calculated from tool start centre position to tool end centre position." at 2037.86,2482.97 h60
  text "Hole Length" at 935.19,2382.99 h60
  text "= Routed Path Length + Tool Size = Slot length as defined in the PCB layout" at 1627.99,2382.99 h60

## Dimensions
3482.36,1437.01 to 3482.36,-137.8 on Dimension
-137.8,1317.01 to 3602.36,1317.01 on Dimension

## Text inside footprints (layer, text, board x,y; h text height)
J3: Bottom Overlay "1" at 1441.72,591.44 h30 r180
U13A: Top Overlay "1" at 2817.09,1336.52 h39.37
U13B: Top Overlay "1" at 2817.09,-2.06 h39.37